# Altium PCB PCB.PcbDoc (part 1 of 2)
Units mm, origin at the board's own origin, x right, y up, seen from the top; angles counter-clockwise.
Board outline 78 x 99 mm, 2 copper layers (Top Layer, Bottom Layer); 105 components, 105 nets, 448 pads, 406 vias.
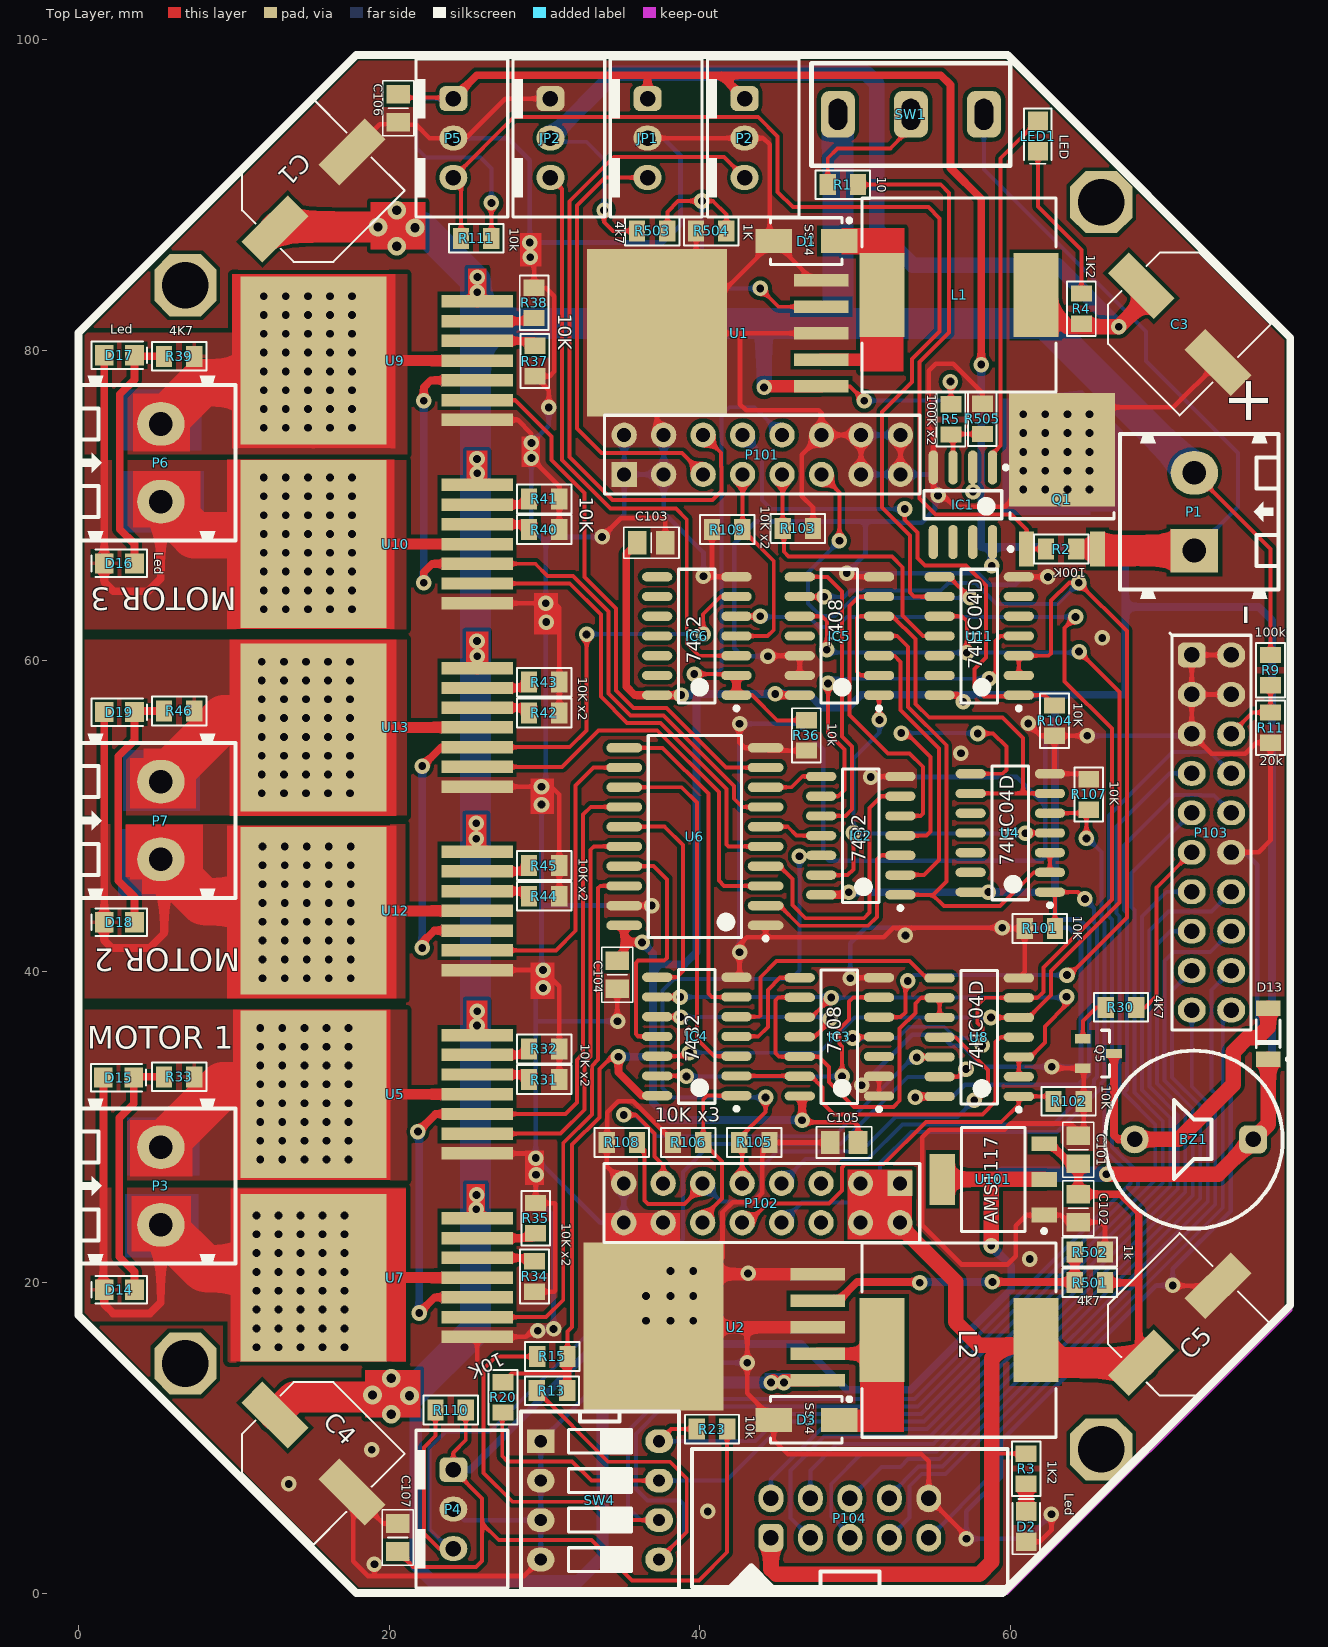
[diagram p0: Top Layer view]
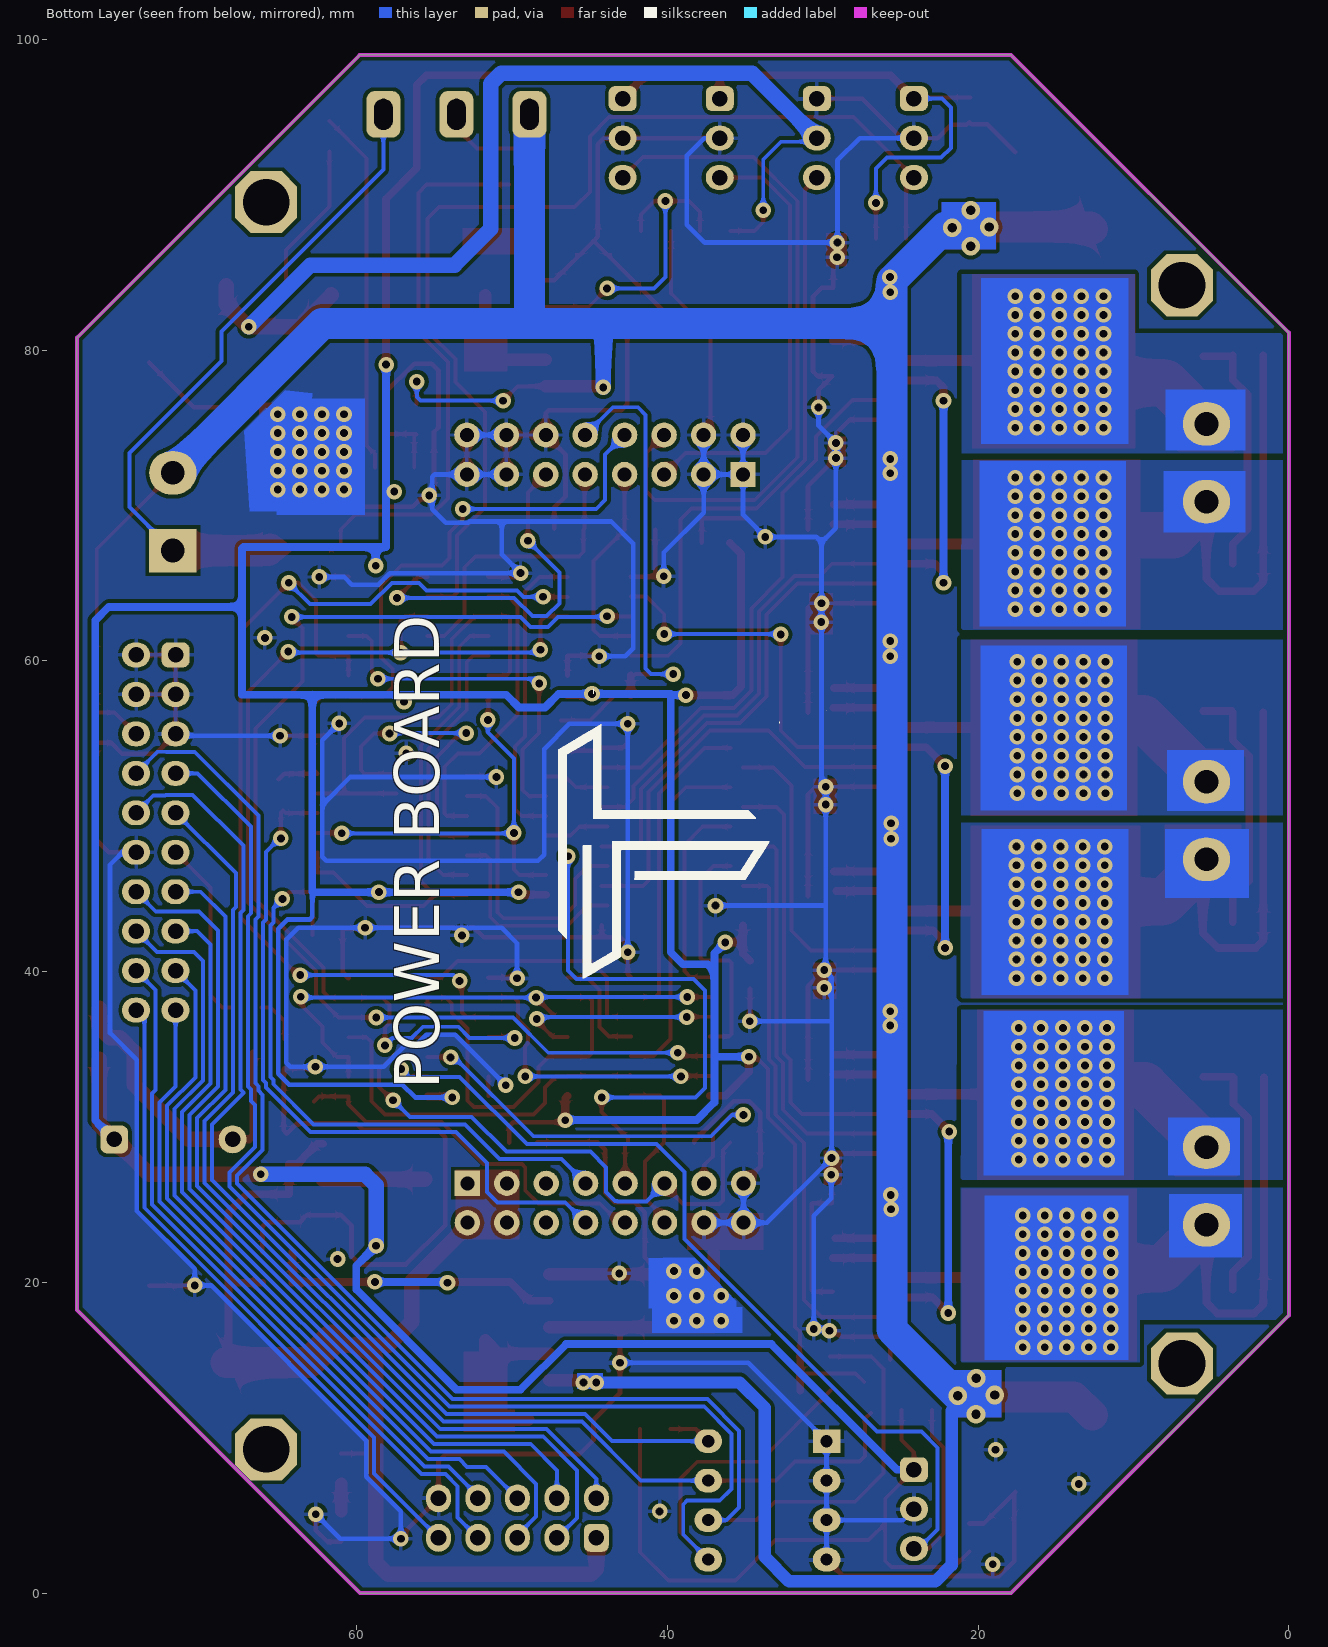
[diagram p1: Bottom Layer view, seen from below]

## Layer stack, top to bottom
Top Solder: solder mask 0.0102, Solder Resist, Dk 3.5
Top Layer: signal copper 0.0356
Dielectric 1: dielectric 0.32, FR-4, Dk 4.8
Bottom Layer: signal copper 0.0356
Bottom Solder: solder mask 0.0102, Solder Resist, Dk 3.5

## Board outline
59.775,0 17.875,0 0,17.875 0,81.125 17.875,99 59.8,99 78,80.8 78,18.225

## Design rules (kind name [scope] priority, off if disabled: settings)
Clearance [All] p1: gap=0.229 ignorepadtopadclearanceinfootprint=FALSE except(0: Arc-Hole Track-Hole SMDPad-Hole THPad-Hole Via-Hole Fill-Hole Poly-Hole Region-Hole Text-Hole; 0.254: Arc-Poly Track-Poly SMDPad-Poly THPad-Poly Via-Poly Fill-Poly Poly-Region Poly-Text; 0.3: Poly-Poly)
PolygonConnect [All] p1: connectstyle=Direct reliefconductorwidth=0.254 reliefentries=4 polygonreliefangle="90 Angle" airgapwidth=0.254
RoutingVias [All] p1: holewidth=0.711 width=1.27 viastyle="Through Hole" minholewidth=0.5 minwidth=1 maxholewidth=0.711 maxwidth=1.27
SolderMaskExpansion [All] p1: expansion=0.102 istentingtop=FALSE
Width [All] p1: maxlimit=10 minlimit=0.254 preferedwidth=0.254
30 further rules are at their usual default settings.

## Classes and differential pairs
component class Sheet1: C1 C3 C4 C5 C101 C102 C103 C104 C105 C106 C107 D1 D2 D3 IC1 L1 L2 LED1 P1 Q1 R1 R2 R3 R4 R5 R501 R502 R503 R504 R505 SW1 U1 U2 U101
component class Sheet2: BZ1 D13 JP1 P2 P103 P104 Q5 R9 R11 R13 R15 R20 R23 R30 SW4
component class Sheet3: D14 D15 D16 D17 D18 D19 IC2 IC3 IC4 IC5 IC6 JP2 P3 P4 P5 P6 P7 P101 P102 R31 R32 R33 R34 R35 R36 R37 R38 R39 R40 R41 R42 R43 R44 R45 R46 R101 R102 R103 R104 R105 R106 R107 R108 R109 R110 R111 U4 U5 U6 U7 U8 U9 U10 U11 U12 U13

## Components (designator, comment, footprint, x,y, rotation, side; value= is the part's Value field where it differs from the comment)
BZ1 "Buzzer" BUZZER 75.6,29.2 r180 top
C1 "470 μF" "WCAP-PSHP 8x7.7x3.1" 15.125,90.275 r45 top
C3 "470 μF" "WCAP-PSHP 8x7.7x3.1" 70.875,81.675 r315 top
C4 "470 μF" "WCAP-PSHP 8x7.7x3.1" 15.125,8.975 r315 top
C5 "470 μF" "WCAP-PSHP 8x7.7x3.1" 70.875,17.3 r45 top
C101 "C" "C 0805" 64.35,28.525 r90 top
C102 "C" "C 0805" 64.35,24.775 r270 top
C103 "C" "C 0805" 36.875,67.6 r0 top
C104 "C" "C 0805" 34.675,39.8 r270 top
C105 "C" "C 0805" 49.275,29 r180 top
C106 "C" "C 0805" 20.575,95.575 r270 top
C107 "C" "C 0805" 20.55,3.575 r90 top
D1 "SS34" "DO-214AC (SMA) L" 46.85,87.025 r0 top
D2 "Led" "Led 0805 Blue" 61,4.275 r270 top
D3 "SS34" "DO-214AC (SMA) L" 46.85,11.15 r0 top
D13 "Diode" "Diode SOD80C Reflow" 76.575,36 r270 top
D14 "Led" "Led 0805 Green" 2.625,19.525 r0 top
D15 "Led" "Led 0805 Blue" 2.575,33.175 r180 top
D16 "Led" "Led 0805 Green" 2.625,66.275 r0 top
D17 "Led" "Led 0805 Blue" 2.625,79.675 r180 top
D18 "Led" "Led 0805 Green" 2.625,43.175 r0 top
D19 "Led" "Led 0805 Blue" 2.625,56.7 r180 top
IC1 "LM358" SOIC-8 56.925,70.05 r270 top
IC2 "7432" SOIC-14 50.35,48.75 r180 top
IC3 "7408" SOIC-14 48.975,35.8 r180 top
IC4 "7432" SOIC-14 39.8,35.825 r180 top
IC5 "7408" SOIC-14 48.975,61.6 r180 top
IC6 "7432" SOIC-14 39.8,61.6 r180 top
JP1 "JP3" HDR/Header/3/BOX 36.625,93.65 r0 top
JP2 "JP3" HDR/Header/3/BOX 30.375,93.65 r0 top
L1 "330uF" 1210 56.675,83.55 r90 top
L2 "330uF" 1210 56.675,16.275 r90 top
LED1 "LED" "Led 0805 Blue" 61.75,93.775 r90 top
P1 "Header 2" HDR/Terminal/2/5mm#1 71.825,69.6 r90 top
P2 "Header 3" HDR/Header/3/BOX 42.875,93.65 r0 top
P3 "Header 2" HDR/Terminal/2/5mm#2 5.3,26.2 r270 top
P4 "Header 3" HDR/Header/3/BOX 24.125,5.4 r0 top
P5 "Header 3" HDR/Header/3/BOX 24.125,93.65 r0 top
P6 "Header 2" HDR/Terminal/2/5mm#2 5.3,72.75 r270 top
P7 "Header 2" HDR/Terminal/2/5mm#2 5.3,49.725 r270 top
P101 "Header 8X2" CON2X8N 35.125,72 r0 top
P102 "Header 8X2" CON2X8N 52.875,26.375 r180 top
P103 "Header 10X2" HDR/Header/20/DL 72.925,48.95 r270 top
P104 "Header 5X2" HDR/Header/10/DL/BOX 49.65,4.825 r180 top
Q1 "Mosfet N" "TO-252 (DPAK)" 63.3,71.65 r90 top
Q5 "Transistor NPN" SOT-23 65.65,34.725 r0 top
R1 "10" "R 0805" 49.2,90.65 r180 top
R2 "100K" "R 0805" 63.25,67.2 r180 top
R3 "1K2" "R 0805" 61,8 r90 top
R4 "1K2" "R 0805" 64.55,82.675 r270 top
R5 "100K x2" "R 0805" 56.15,75.55 r90 top
R9 "100k" "R 0805" 76.725,59.4 r90 top
R11 "20k" "R 0805" 76.725,55.7 r90 top
R13 "10K" "R 0805" 30.475,13.025 r180 top
R15 "10k" "R 0805" 30.5,15.225 r180 top
R20 "10k" "R 0805" 27.325,12.6 r270 top
R23 "10k" "R 0805" 40.775,10.55 r180 top
R30 "4K7" "R 0805" 67.1,37.7 r180 top
R31 "10K x2" "R 0805" 29.975,33.05 r0 top
R32 "10k" "R 0805" 29.975,35.025 r0 top
R33 "4k7" "R 0805" 6.475,33.225 r0 top
R34 "10K x2" "R 0805" 29.35,20.375 r270 top
R35 "10k" "R 0805" 29.425,24.125 r90 top
R36 "10k" "R 0805" 46.85,55.2 r270 top
R37 "10K" "R 0805" 29.375,79.3 r270 top
R38 "10k" "R 0805" 29.325,83.05 r90 top
R39 "4K7" "R 0805" 6.475,79.6 r0 top
R40 "10k" "R 0805" 29.975,68.45 r0 top
R41 "10K" "R 0805" 29.975,70.425 r0 top
R42 "10k" "R 0805" 29.975,56.65 r180 top
R43 "10K x2" "R 0805" 29.975,58.625 r180 top
R44 "10K x2" "R 0805" 29.975,44.85 r180 top
R45 "10k" "R 0805" 29.975,46.825 r180 top
R46 "4k7" "R 0805" 6.475,56.775 r0 top
R101 "10K" "R 0805" 61.875,42.775 r0 top
R102 "10K" "R 0805" 63.725,31.65 r180 top
R103 "10K x2" "R 0805" 46.3,68.525 r180 top
R104 "10K" "R 0805" 62.825,56.15 r90 top
R105 "10K x3" "R 0805" 43.5,29 r180 top
R106 "10k" "R 0805" 39.237,29 r0 top
R107 "10K" "R 0805" 65.025,51.4 r270 top
R108 "10k" "R 0805" 34.975,29 r0 top
R109 "10k" "R 0805" 41.75,68.45 r0 top
R110 "10k" "R 0805" 23.95,11.775 r180 top
R111 "10k" "R 0805" 25.6,87.2 r180 top
R501 "4k7" "R 0805" 65.1,19.975 r0 top
R502 "1k" "R 0805" 65.1,21.95 r180 top
R503 "4k7" "R 0805" 36.925,87.675 r180 top
R504 "1K" "R 0805" 40.725,87.675 r0 top
R505 "100k" "R 0805" 58.175,75.575 r270 top
SW1 "SW SPDT" SW/3/SPDT/SS12D10 53.575,95.175 r180 top
SW4 "SW DIP-4" SW/DIP4 29.75,9.775 r270 top
U1 "LM2596S" "TO263 5" 43.75,81.1 r90 top
U2 "LM2596S" "TO263 5" 43.525,17.125 r90 top
U4 "74HC04D" SOIC-14 59.975,48.925 r180 top
U5 "BTS7960" BTS7960 21.975,32.105 r90 top
U6 "74LVC244A" SOIC20-W 44.225,42.975 r90 top
U7 "BTS7960" BTS7960 21.975,20.3 r90 top
U8 "74HC04D" SOIC-14 57.975,35.775 r180 top
U9 "BTS7960" BTS7960 21.975,79.325 r90 top
U10 "BTS7960" BTS7960 21.975,67.52 r90 top
U11 "74HC04D" SOIC-14 57.975,61.6 r180 top
U12 "BTS7960" BTS7960 21.975,43.91 r90 top
U13 "BTS7960" BTS7960 21.975,55.715 r90 top
U101 "AMS1117" SOT-223 58.875,26.625 r180 top

## Footprints (in the part's own frame and the unit in brackets; to place one, negate y for a bottom-side part, rotate by r counter-clockwise, add the part's x,y. Pads: shape width x height; smd on the part's side, far side on the other; paste and mask are expansions set on the pad)
1210 [mm] "Precision Wire Wound Inductor, 2-Leads, Body 12.0x12.0mm, IPC Medium Density"
  rect 5.4x2.9 smd: 1(0,4.95) 2(0,-4.95)
  silkscreen extent -6.25,-6.25 6.25,6.25, body extent -6,-6 6,6, height 9.7
BTS7960 [mm]
  rect 0.8x4.6 smd: 1(-3.81,-3.683) 2(-2.54,-3.683) 3(-1.27,-3.683) 4(0,-3.683) 5(1.27,-3.683) 6(2.54,-3.683) 7(3.81,-3.683)
  rect 10.8x9.4 smd: 8(0,6.858)
  body extent -5,-4.99 5,10.68, height 4.88
BUZZER [mm] "DC Buzzer 5V/12V"
  rrect50% 1.8x1.8 hole 1: 1(0,0)
  round 1.8 hole 1: 2(7.62,0)
  silkscreen extent -1.91,-5.71 9.53,5.75, body extent -5.64,-6 9.81,6, height 9.65
"C 0805" [mm] "Chip Capacitor, 2-Leads, Body 2.0x1.3mm, IPC Medium Density"
  rect 1.2x1.5 smd: 1(-0.9,0) 2(0.9,0)
  silkscreen extent -1.78,-1 1.78,1, body extent -1,-0.64 1,0.61, height 0.6
CON2X8N [mil]
  rect 64x64 hole 35.43: 1(0,0)
  round 64 hole 35.43: 2(0,100) 3(100,0) 4(100,100) 5(200,0) 6(200,100) 7(300,0) 8(300,100) 9(400,0) 10(400,100) 11(500,0) 12(500,100) 13(600,0) 14(600,100) 15(700,0) 16(700,100)
  silkscreen extent -50,-50 750,150, body extent -50,-50 750,150, height 350
"Diode SOD80C Reflow" [mm]
  rect 1x1.6 smd: 1(-1.65,0) 2(1.65,0)
  silkscreen extent -0.89,-0.76 1.75,1.37, body extent -1.75,-0.73 1.75,0.73, height 1.44
"DO-214AC (SMA) L" [mm] "Molded Diode, 2-Leads, Body 4.3x2.7mm, IPC Medium Density"
  rect 2.35x1.55 smd: 1(-2.1,0) 2(2.1,0)
  silkscreen extent -2.3,-1.5 2.89,1.5, body extent -2.6,-1.3 2.6,1.3, height 2.4
HDR/Header/3/BOX [mm]
  rrect50% 1.8x1.6 hole 1: 1(0,2.54)
  oval 1.8x1.6 hole 1: 2(0,0) 3(0,-2.54)
  silkscreen extent -2.41,-5.08 3.5,5.08, body extent -2.29,-5 3.41,5, height 7
HDR/Header/10/DL/BOX [mm] "10 pins Male Box Header, IDC Socket"
  rrect50% 1.6x1.8 hole 1: 1(5.08,1.27)
  oval 1.6x1.8 hole 1: 2(5.08,-1.27) 3(2.54,1.27) 4(2.54,-1.27) 5(0,1.27) 6(0,-1.27) 7(-2.54,1.27) 8(-2.54,-1.27) 9(-5.08,1.27) 10(-5.08,-1.27)
  silkscreen extent -10.16,-4.45 10.16,4.58, body extent -10.16,-4.81 10.16,4.66, height 9.27
HDR/Header/20/DL [mm]
  rrect50% 1.6x1.8 hole 1: 1(-11.43,-1.27)
  oval 1.6x1.8 hole 1: 2(-11.43,1.27) 3(-8.89,-1.27) 4(-8.89,1.27) 5(-6.35,-1.27) 6(-6.35,1.27) 7(-3.81,-1.27) 8(-3.81,1.27) 9(-1.27,-1.27) 10(-1.27,1.27) 11(1.27,-1.27) 12(1.27,1.27) 13(3.81,-1.27) 14(3.81,1.27) 15(6.35,-1.27) 16(6.35,1.27) 17(8.89,-1.27) 18(8.89,1.27) 19(11.43,-1.27) 20(11.43,1.27)
  silkscreen extent -12.83,-2.67 12.7,2.54, body extent -12.7,-2.54 12.7,2.54, height 8.89
HDR/Terminal/2/5mm#1 [mil] "Header 2, 2 pin, hight 400mil, Pin to Pin 200mil, Colour Green"
  rect 110x120 hole 60: 1(-98.43,0)
  oval 110x120 hole 60: 2(98.43,0)
  silkscreen extent -220,-213 197,189, body extent -220,-215 197,191, height 559
HDR/Terminal/2/5mm#2 [mil] "Header 2, 2 pin, hight 400mil, Pin to Pin 200mil, Colour Green"
  oval 110x120 hole 60: 1(-98.43,0) 2(98.43,0)
  silkscreen extent -220,-213 197,189, body extent -220,-215 197,191, height 559
"Led 0805 Blue" [mm] "Led SMD 0805"
  rect 1.2x1.3 smd: 1(-0.975,0) 2(0.975,0)
  silkscreen extent -1.78,-0.89 1.78,0.89, body extent -1.01,-0.62 1.01,0.63, height 1.1
"Led 0805 Green" [mm] "Led SMD 0805"
  rect 1.2x1.3 smd: 1(-0.975,0) 2(0.975,0)
  silkscreen extent -1.78,-0.89 1.78,0.89, body extent -1.01,-0.62 1.01,0.63, height 1.1
"R 0805" [mm] "Chip Resistor, 2-Leads, Body 2.0x1.3mm, IPC Medium Density"
  rect 1.05x1.35 smd: 1(-0.975,0) 2(0.975,0)
  silkscreen extent -1.75,-0.92 1.75,0.92, body extent -1,-0.61 1,0.59, height 0.5
SOIC20-W [mm] "SOIC, 20-Leads, Body 12.8x7.5mm, Pitch 1.27mm, IPC Medium Density"
  oval 0.6x2.3 smd: 1(0,0) 2(1.27,0) 3(2.54,0) 4(3.81,0) 5(5.08,0) 6(6.35,0) 7(7.62,0) 8(8.89,0) 9(10.16,0) 10(11.43,0) 11(11.43,9.1) 12(10.16,9.1) 13(8.89,9.1) 14(7.62,9.1) 15(6.35,9.1) 16(5.08,9.1) 17(3.81,9.1) 18(2.54,9.1) 19(1.27,9.1) 20(0,9.1)
  silkscreen extent -0.97,-0.13 12.21,7.55, body extent -0.68,0.8 12.11,8.3, height 2.65
SOIC-8 [mm] "SOIC, 8-Leads, Body 5.0x4.0mm (max), Pitch 1.27mm, IPC Medium Density"
  oval 2.2x0.6 smd: 1(-2.4,1.905) 2(-2.4,0.635) 3(-2.4,-0.635) 4(-2.4,-1.905) 5(2.4,-1.905) 6(2.4,-0.635) 7(2.4,0.635) 8(2.4,1.905)
  silkscreen extent -2.52,-2.5 0.9,2.88, body extent -3,-2.49 3,2.41, height 1.75
SOIC-14 [mm] "SOIC, 14-Leads, Body 8.6x3.9mm (max), Pitch 1.27mm, IPC Medium Density"
  oval 1.95x0.6 smd: 1(-2.55,3.81) 2(-2.55,2.54) 3(-2.55,1.27) 4(-2.55,0) 5(-2.55,-1.27) 6(-2.55,-2.54) 7(-2.55,-3.81) 8(2.55,-3.81) 9(2.55,-2.54) 10(2.55,-1.27) 11(2.55,0) 12(2.55,1.27) 13(2.55,2.54) 14(2.55,3.81)
  silkscreen extent -2.68,-4.3 1.17,4.78, body extent -3.03,-4.34 3.03,4.36, height 1.95
SOT-23 [mm] "SOT23, 3-Leads, Body 3.0x2.5mm (max), Pitch 0.95mm, IPC Medium Density"
  rect 1x0.6 smd: 1(-1,0.95) 2(-1,-0.95) 3(1,0)
  silkscreen extent 0.2,-1.5 0.7,1.5, body extent -1.28,-1.46 1.27,1.46, height 0.95
SOT-223 [mm] "SOT223, 4-Leads, Body 6.7x7.3mm (max), Pitch 2.30mm, IPC Medium Density"
  rect 1.65x0.95 smd: 1(-3.275,2.3) 2(-3.275,0) 3(-3.275,-2.3)
  rect 1.65x3.3 smd: 4(3.275,0)
  silkscreen extent -3.4,-3.35 2.05,3.45, body extent -3.5,-3.25 3.5,3.25, height 1.64
SW/3/SPDT/SS12D10 [mm]
  rrect50% 2.2x3 hole 1.2 slot 2 at 90 deg: 1(-4.7,0) 2(0,0) 3(4.7,0)
  silkscreen extent -6.4,-3.3 6.4,3.3, body extent -6.4,-3.3 6.35,3.8, height 12.5
SW/DIP4 [mil]
  rect 60x70 hole 31: 1(0,0)
  oval 60x70 hole 31: 2(100,0) 3(200,0) 4(300,0) 5(300,300) 6(200,300) 7(100,300) 8(0,300)
  silkscreen extent -75,-50 375,350, body extent -50,0 350,300, height 165
"TO263 5" [mm] "LM2596S"
  rect 0.8x3.5 smd: 1(-3.429,-4.064) 2(-1.722,-4.064) 3(-0.015,-4.064) 4(1.693,-4.064) 5(3.4,-4.064)
  rect 10.8x9 smd: 6(0.025,6.525)
  body extent -5,-4.99 5,10.68, height 4.88
"TO-252 (DPAK)" [mm] "D-PAK, 3-Pads, Body 6.2x6.7mm (max), IPC Medium Density"
  rect 2.25x0.95 smd: 1(-4.45,2.28) 3(-4.45,-2.28)
  rect 7.3x6.8 smd: 2(1.95,0)
  silkscreen extent -4.57,-3.35 -2.1,3.43, body extent -4.54,-3.27 5.4,3.27, height 2.41
"WCAP-PSHP 8x7.7x3.1" [mm] "Polarized capacitors, Aluminum Polymer Capacitors, 2-Leads, Body 8x7.7x3.1"
  rect 4.2x1.9 smd: 1(-3.5,0) 2(3.5,0)
  silkscreen extent -4.15,-4.15 4.15,4.15, body extent -4.54,-4.17 4.46,4.13, height 7.65

## Part data
C1 C3 C4 C5: library part "WCAP-PSHP 8x7.7x3.1 875115150001", "WCAP-PSHP Aluminum Polymer Capacitors , 220 µF; + / - 20%; 6,3 V , 8 x 7,7"
C101 C102 C103 C104 C105 C106 C107: library part "Capacitor NP", "Capacitor non-pol"
D1 D3: library part Zener
D2 D14 D15 D16 D17 D18 D19: "Typical LED"
D13: "Default Diode"
IC1: "Low Power Dual Operational Amplifier, 8-pin MDIP"
IC2 IC4 IC6: "Quad 2-Input OR Gate"
IC3 IC5: "Quad 2-Input AND Gate"
JP1 JP2: library part Con3, "Connector 3"
L1 L2: library part Component_1
LED1: library part LEDSMD, "LED 3mm"
P1 P3 P6 P7: "Header, 2-Pin"
P2 P4 P5: "Header, 3-Pin"
P101 P102: "Header, 8-Pin, Dual row"
P103: "Header, 10-Pin, Dual row"
P104: "Header, 5-Pin, Dual row"
Q5: "NPN Bipolar Transistor"
R1 R2 R3 R4 R5 R9 R11 R13 R15 R20 R23 R30 R31 R32 R33 R34 R35 R36 R37 R38 R39 R40 R41 R42 R43 R44 R45 R46 R101 R102 R103 R104 R105 R106 R107 R108 R109 R110 R111 R501 R502 R503 R504 R505: library part Resistor, "Resistor"
U4 U8 U11: "IC INVERTER HEX TTL/LSTTL 14SOIC"
U6: "Octal Buffer/Driver with 3-State Outputs"
U101: "1A LDO Voltage Regulator, ADJ or fixed 1.5/1.8/2.5/2.85/3.3/5V"

## Free pads (board coordinates)
  oct 4x4 hole 3: 2(65.825,9.25) 3(65.825,89.525) 4(6.875,14.775) 5(6.875,84.175)

## Via types
v1: diameter 1, hole 0.5, Top Layer to Bottom Layer, tented both sides, 398 vias
v2: diameter 1.2, hole 0.6, Top Layer to Bottom Layer, tented both sides, 8 vias

## Nets (pads, with @x,y where several pads share a name; then routed paths per layer and width w, separated by ;. In a path a pad name is that pad's centre, name@x,y a point inside that pad or via, vN(x,y) a via of type N, cw(c..) or ccw(c..) an arc to the next point about the centre after c; other vN are vias at no path point)
6V: C3.1 JP2.2 L1.2 R4.2 R503.2 | length 70.4
  Top Layer w0.254: v1(33.825,89) 33.825,88.25 34.4,87.675 R503.2@35.95,87.675
  Top Layer w1: L1.2@61.625,83.55 63.675,81.5 v1(66.95,81.5) 68.4,82.95 C3.1@68.4,84.15
  Bottom Layer w0.254: JP2.2@30.375,93.65 30.612,93.413 32.687,93.413 33.825,92.275 v1(33.825,89)
  Bottom Layer w1: JP2.2@30.375,93.65 34.55,97.825 50.7,97.825 51.375,97.15 51.375,87.8 53.7,85.475 62.975,85.475 v1(66.95,81.5)
7V: C5.1 C101.1 C102.1 L2.2 P102.1 P102.2 P102.3 P102.4 P102.5 P102.6 P104.1 R3.2 R501.2 U101.3 | length 80.6
  Top Layer w0.254: 58.775,8.775 58.975,8.975 R3.2@61,8.975 ; L2.2@61.312,15.963 L2.2@61.625,16.275
  Top Layer w0.5: P102.4@50.335,23.835 P102.3@50.335,26.375 P102.1@52.875,26.375 ; U101.3@62.15,28.925 62.525,28.925 63.825,27.625 C101.1@64.35,27.625 C102.1@64.35,25.675 67.075,25.675 68.25,24.5 68.25,20.2 ; R501.2@66.075,19.975 68.025,19.975 68.25,20.2 ; C5.1@68.4,14.825 68.25,14.975 68.25,20.2
  Top Layer w1: P104.1@44.57,3.555 44.57,1.545 44.915,1.2 57.975,1.2 58.775,2 58.775,8.775 58.775,15.1 59.637,15.963 ; P102.2@52.875,23.835 52.875,23.625 56.45,20.05 56.45,17.45 57.937,15.963 59.637,15.963 ; L2.2@61.312,15.963 59.637,15.963
  Top Layer w2: L2.2@61.625,16.275 63.075,14.825 C5.1@68.4,14.825
ADC1: P103.13 P104.2 | length 56.7
  Bottom Layer w0.254: P104.2@44.57,6.095 44.57,7.327 47.788,10.546 54.618,10.546 70.272,26.199 70.272,30.571 68.451,32.391 68.451,43.551 70.04,45.14 P103.13@71.655,45.14
ADC2: P103.14 P104.3 | length 61
  Bottom Layer w0.254: P104.3@47.11,3.555 45.825,4.84 45.825,7.9 47.988,10.063 54.818,10.063 70.754,25.999 70.754,30.771 68.934,32.591 68.934,42.659 70.15,43.875 72.93,43.875 P103.14@74.195,45.14
ADC3: P103.15 P104.4 | length 52.6
  Bottom Layer w0.254: P104.4@47.11,6.095 47.11,7.898 48.792,9.58 55.018,9.58 71.237,25.799 71.237,30.97 69.416,32.791 69.416,41.741 70.275,42.6 P103.15@71.655,42.6
ADC4: P103.16 P104.5 | length 55.9
  Bottom Layer w0.254: P104.5@49.65,3.555 49.65,3.725 48.45,4.925 48.45,7.025 50.523,9.098 55.218,9.098 71.72,25.6 71.72,31.17 69.899,32.991 69.899,40.674 70.475,41.25 72.845,41.25 P103.16@74.195,42.6
ADC5: P103.17 P104.6 | length 46.5
  Bottom Layer w0.254: P104.6@49.65,6.095 51.68,8.125 52.895,8.125 53.385,8.615 55.418,8.615 72.202,25.4 72.202,31.37 70.382,33.191 70.382,38.787 P103.17@71.655,40.06
ADC6: P103.18 P104.7 | length 46.7
  Bottom Layer w0.254: P104.7@52.19,3.555 53.5,4.865 53.5,6.875 54.275,7.65 55.818,7.65 73.167,25 73.167,32.158 72.939,32.386 72.939,38.804 P103.18@74.195,40.06
ADC7: P103.19 P104.8 | length 41.2
  Bottom Layer w0.254: P104.8@52.19,6.095 52.19,6.247 54.075,8.133 55.618,8.133 72.685,25.2 72.685,31.57 71.655,32.6 P103.19@71.655,37.52
ADC8: P103.20 P104.9 | length 42
  Bottom Layer w0.254: P104.9@54.73,3.555 58.875,7.7 58.875,10.025 73.65,24.8 73.65,36.975 P103.20@74.195,37.52
B-: P1.1 Q1.3 R2.1 SW1.1 | length 43.6
  Top Layer w0.254: R2.1@64.225,67.2 Q1.3@65.58,67.2
  Top Layer w2: Q1.3@65.58,67.2 65.68,67.1 P1.1@71.825,67.1
  Bottom Layer w0.254: SW1.1@58.275,95.175 58.275,91.625 68.7,81.2 68.7,79.3 74.625,73.375 74.625,69.9 P1.1@71.825,67.1
BRK1: IC2.12 P102.9 R105.2 | length 36.3
  Top Layer w0.254: P102.9@42.715,26.375 42.715,28.81 R105.2@42.525,29 42.525,29.275 44.225,30.975 v1(44.225,31.9) ; v1(46.4,47.425) v1@46.5,47.525
  Bottom Layer w0.254: v1(44.225,31.9) 38.175,31.9 37.575,32.5 37.575,38.775 38.325,39.525 45.85,39.525 46.4,40.075 v1(46.4,47.425)
BRK2: IC4.1 P102.12 R106.2 | length 11.2
  Top Layer w0.254: P102.12@40.175,23.835 40.175,24.15 41.425,25.4 41.425,27.788 R106.2@40.213,29 40.213,31.762 40.465,32.015 IC4.1@42.35,32.015
BRK3: IC6.4 P101.7 R109.2 | length 13.4
  Top Layer w0.254: IC6.4@42.35,61.6 44.35,61.6 44.75,62 44.75,66.425 R109.2@42.725,68.45 42.745,68.47 P101.7@42.745,72
D1: IC2.4 U4.8 | length 20.5
  Top Layer w0.254: IC2.4@52.9,48.75 54.575,48.75 54.833,49.008 54.833,53.385 54.825,53.393 54.825,53.825 53.3,55.35 v1(52.95,55.35) ; U4.8@57.425,52.735 59.485,52.735 59.725,52.975 59.725,54.475 58.875,55.325 v1(57.875,55.325)
  Bottom Layer w0.254: v1(52.95,55.35) 57.9,55.35 v1(57.875,55.325)
D1~: IC5.2 IC5.5 U4.6 U4.9 | length 30
  Top Layer w0.254: IC5.2@51.525,59.06 50.355,59.06 50.115,59.3 50.115,62.75 50.235,62.87 IC5.5@51.525,62.87 52.405,62.87 53.875,61.4 53.875,57.232 54.757,56.35 59.475,56.35 60.8,55.025 60.8,51.465 ; U4.9@57.425,51.465 60.8,51.465 ; U4.6@62.525,51.465 60.8,51.465
D2: IC4.5 U8.8 | length 16.5
  Top Layer w0.254: IC4.5@42.35,37.095 43.805,37.095 43.885,37.175 43.885,39.635 44.925,40.675 53.5,40.675 54.59,39.585 U8.8@55.425,39.585
D2~: IC3.9 IC3.12 U8.9 U8.10 | length 24.9
  Top Layer w0.254: IC3.9@46.425,38.34 45.04,38.34 44.85,38.15 44.85,34.75 45.07,34.53 IC3.12@46.425,34.53 47.62,34.53 48.294,33.856 48.294,32.896 49.907,31.283 52.45,31.283 52.856,31.688 52.856,36.323 53.875,37.343 53.875,37.95 54.24,38.315 U8.9@55.425,38.315 U8.10@55.425,37.045
D3: IC2.9 U11.4 | length 23.7
  Top Layer w0.254: IC2.9@47.8,51.29 48.907,51.29 49.317,51.7 49.317,54.285 48.25,55.353 v1(48.25,58.55) ; v1(58.625,58.85) 58.625,58.925 59.025,59.325 59.025,61.275 59.35,61.6 U11.4@60.525,61.6
  Bottom Layer w0.254: v1(48.25,58.55) 48.55,58.85 v1(58.625,58.85)
D3~: IC3.5 IC5.9 U11.2 U11.3 | length 71.1
  Top Layer w0.254: IC5.9@46.44,64.125 v1(48,64.125) ; IC3.5@51.525,37.07 52.92,37.07 53.225,37.375 53.225,39.4 v1(53.375,39.4) ; U11.2@60.525,59.06 U11.3@60.525,60.33 62.445,60.33 62.6,60.485 62.6,63.875 63.75,65.025 v1(64.375,65.025) 67.475,61.925 67.475,43.475 63.775,39.775 v1(63.625,39.775)
  Bottom Layer w0.254: v1(48,64.125) 49.26,64.125 49.668,64.533 55.5,64.533 55.992,65.025 57.725,65.025 59.1,63.65 63,63.65 v1(64.375,65.025) ; v1(53.375,39.4) 53.75,39.775 v1(63.625,39.775)
DIR1: P102.8 R107.2 U4.5 | length 46.1
  Top Layer w0.254: U4.5@62.525,50.195 64.57,50.195 64.75,50.375 64.875,50.25 v1(64.875,48.575)
  Bottom Layer w0.254: P102.8@45.255,23.835 46.57,25.15 50.925,25.15 51.6,25.825 51.6,27.675 53.6,29.675 62.967,29.675 65.842,32.55 65.842,32.82 66.038,33.016 66.038,43.164 65.842,43.359 65.842,47.708 65.1,48.45 65,48.45 v1(64.875,48.575)
DIR2: P102.11 R108.2 U8.11 | length 36.3
  Top Layer w0.254: R108.2@35.95,29 36.425,28.525 36.425,25.275 36.65,25.05 39,25.05 40.175,26.225 P102.11@40.175,26.375 ; U8.11@55.425,35.775 56.44,35.775 58.548,33.667 58.548,32.575 57.698,31.725 v1(57.65,31.725)
  Bottom Layer w0.254: P102.11@40.175,26.375 41.343,25.207 43.217,25.207 43.236,25.225 43.375,25.225 43.95,25.8 43.95,27.4 44.958,28.408 50.358,28.408 52.6,30.65 56.575,30.65 v1(57.65,31.725)
DIR3: P101.8 R104.2 U11.1 | length 35.3
  Top Layer w0.254: v1(53.175,69.775) 53.175,69.107 54.015,68.267 54.015,66.625 54.49,66.15 57.125,66.15 58.425,64.85 58.425,60.225 57.675,59.475 57.675,58.325 58.281,57.719 60.454,57.719 U11.1@60.525,57.79 62.16,57.79 R104.2@62.825,57.125
  Bottom Layer w0.254: P101.8@42.745,74.54 44,73.285 44,70.35 44.575,69.775 v1(53.175,69.775)
EN1: U5.3 U6.14 U7.3 | length 48.4
  Top Layer w0.254: U5.3@25.658,30.835 31.335,30.835 32.075,31.575 32.075,34.322 32.485,34.732 32.485,50.11 32.97,50.595 U6.14@35.125,50.595
  Top Layer w0.5: v1(21.85,29.7) 22.985,30.835 U5.3@25.658,30.835 ; v1(21.925,18.025) 22.93,19.03 U7.3@25.658,19.03
  Bottom Layer w0.5: v1(21.85,29.7) 21.925,29.7 v1(21.925,18.025)
EN1_: IC2.11 U6.6 | length 4.2
  Top Layer w0.254: U6.6@43.85,49.325 45.65,49.325 46.225,48.75 IC2.11@47.8,48.75
EN2: U6.7 U9.3 U10.3 | length 49.2
  Top Layer w0.254: U10.3@25.658,66.25 29.4,66.25 30.187,65.463 31.82,65.463 34.108,63.175 34.108,57.9 35.517,56.49 37.65,56.49 42.19,51.95 42.19,51.125 42.72,50.595 U6.7@44.225,50.595
  Top Layer w0.5: v1(22.225,65.025) 22.225,65.7 22.775,66.25 U10.3@25.658,66.25 ; v1(22.225,76.75) 22.225,77.6 22.68,78.055 U9.3@25.658,78.055
  Bottom Layer w0.5: v1(22.225,65.025) v1(22.225,76.75)
EN2_: IC4.3 U6.13 | length 22.5
  Top Layer w0.254: U6.13@35.925,51.865 38.81,51.865 39.8,50.875 39.8,35.65 40.895,34.555 IC4.3@42.35,34.555
EN3: IC6.6 U12.3 U13.3 | length 45
  Top Layer w0.254: U13.3@25.658,54.445 31.62,54.445 32.7,55.525 v1(32.7,61.7) ; v1(40.2,61.725) 40.2,63 41.34,64.14 IC6.6@42.35,64.14
  Top Layer w0.5: v1(22.125,41.525) 22.125,41.875 22.89,42.64 U12.3@25.658,42.64 ; v1(22.125,53.225) 23.345,54.445 U13.3@25.658,54.445
  Bottom Layer w0.254: v1(32.7,61.7) 32.725,61.725 v1(40.2,61.725)
  Bottom Layer w0.5: v1(22.125,41.525) v1(22.125,53.225)
"ENCODER 1": P102.13 U8.12 | length 28.9
  Top Layer w0.254: v1(35.1,30.775) 35.878,30.775 37.075,29.578 37.075,28.11 37.635,27.55 P102.13@37.635,26.375 ; v1(53.95,34.475) 53.98,34.505 U8.12@55.425,34.505
  Bottom Layer w0.254: v1(35.1,30.775) 35.825,30.775 37.2,29.4 48.627,29.4 53.702,34.475 v1(53.95,34.475)
"ENCODER 2": P101.11 U11.8 | length 23.4
  Top Layer w0.254: P101.11@47.825,72 48.975,70.85 v1(48.975,67.725) ; U11.8@55.425,65.41 56.04,65.41 v1(57.4,64.05)
  Bottom Layer w0.254: v1(48.975,67.725) 46.95,65.7 46.95,63.7 47.775,62.875 48.692,62.875 49.867,64.05 v1(57.4,64.05)
GATE: JP1.3 P101.5 | length 29
  Top Layer w0.254: JP1.3@36.625,91.11 33.885,91.11 32.09,89.315 32.09,74.95 33.669,73.372 38.833,73.372 P101.5@40.205,72
GND: C1.2 C3.2 C4.2 C5.2 C101.2 C102.2 C103.2 C104.2 C105.2 C106.2 C107.2 D1.1 D2.2 D3.1 IC1.4 IC2.7 IC3.1 IC3.2 IC3.7 IC4.7 IC5.7 IC5.12 IC5.13 IC6.7 JP1.2 JP2.1 P2.2 P4.2 P5.2 P101.1 P101.2 P101.3 P101.4 P101.12 P101.13 P101.14 P101.15 P101.16 P102.14 P102.15 P102.16 P103.1 P103.2 P103.3 P103.4 P103.5 P103.12 P104.10 Q1.2 Q5.2 R11.1 R31.2 R32.2 R34.2 R35.2 R36.2 R37.2 R38.2 R40.2 R41.2 R42.1 R43.1 R44.1 R45.1 R101.1 R102.1 R103.1 R104.1 R105.1 R106.1 R107.1 R108.1 R109.1 R502.1 R504.1 R505.1 SW4.1 SW4.2 SW4.3 SW4.4 U1.3 U1.5 U1.6 U2.3 U2.5 U2.6 U4.7 U5.1 U6.1 U6.10 U6.19 U7.1 U8.7 U9.1 U10.1 U11.7 U12.1 U13.1 U101.1 | length 837.3
  Top Layer w0.254: P101.4@37.225,74.98 U1.6@37.225,81.125 39.75,83.65 R504.1@39.75,87.675 ; IC3.1@51.525,31.99 IC3.2@51.525,33.26
  Top Layer w0.3: C4.2@17.6,6.5 C4.2@17.675,6.425 ; C1.2@17.6,92.75 19.398,94.548 20.448,94.548 C106.2@20.575,94.675 20.75,94.5 21.741,94.5 22.591,93.65 P5.2@24.125,93.65 24.925,93.65 27.465,96.19 JP2.1@30.375,96.19 ; v1(19.05,1.85) 19.05,1.175 18.975,1.1 ; C107.2@20.55,4.475 19.625,4.475 C4.2@17.675,6.425 ; P4.2@23.6,5.4 P4.2@24.125,5.4 ; 25.658,15.033 U7.1@25.658,16.49 28.79,16.49 v1@29.3,17 ; U5.1@25.658,28.295 29.13,28.295 v1(29.425,28) R35.2@29.425,25.1 30.644,25.1 30.694,25.05 30.694,19.475 30.619,19.4 R34.2@29.35,19.4 ; U12.1@25.658,40.1 v1(29.9,40.1) 30.95,39.05 R32.2@30.95,35.025 R31.2@30.95,33.05 ; U13.1@25.658,51.905 v1(29.8,51.905) 30.445,51.905 30.95,51.4 R45.1@30.95,46.825 R44.1@30.95,44.85 ; U10.1@25.658,63.71 v1(30.075,63.71) 30.665,63.71 30.95,63.425 R43.1@30.95,58.625 R42.1@30.95,56.65 ; U9.1@25.658,75.515 28.26,75.515 29.15,74.625 v1(29.15,74.025) v1(29.15,73.05) 30.95,71.25 R41.2@30.95,70.425 R40.2@30.95,68.45 ; v1@28.775,87.2 v1(29.05,86.925) 29.325,86.65 R38.2@29.325,84.025 30.069,84.025 30.619,83.475 30.619,78.625 30.319,78.325 R37.2@29.375,78.325 30.275,77.425 30.275,76.321 v1(30.266,76.312) ; v1(29.566,16.884) v1@29.566,17.041 ; SW4.4@29.75,2.155 28.695,1.1 18.975,1.1 ; v1(33.7,67.975) 34.9,69.175 37.725,69.175 37.775,69.125 C103.2@37.775,67.6 ; C104.2@34.675,38.9 34.675,36.825 v1(34.7,36.8) ; P102.15@35.095,26.375 34,27.47 R108.1@34,29 34.028,29.028 34.028,30.95 34.732,31.654 35.714,31.654 38.262,29.105 R106.1@38.262,29 ; U6.19@35.125,44.245 36.895,44.245 v1(36.9,44.25) ; JP1.2@36.625,93.65 P2.2@42.875,93.65 44.082,93.65 44.482,93.25 44.482,87.293 D1.1@44.75,87.025 ; U2.6@37,17.15 40.375,20.525 41.45,21.6 41.45,24.5 42.1,25.15 43.4,25.15 44,25.75 44,28.525 R105.1@44.475,29 C105.2@48.375,29 ; v1(40.225,65.45) 40.265,65.41 40.99,65.41 ; R109.1@40.775,68.45 40.775,65.625 40.99,65.41 ; IC4.7@42.35,39.635 42.55,39.835 v1(42.55,41.25) 42.55,41.725 43.025,42.2 44.225,42.2 ; IC6.7@42.35,65.41 40.99,65.41 ; v1(42.55,55.95) 42.55,54.725 42.87,54.405 U6.10@44.225,54.405 44.405,54.225 R36.2@46.85,54.225 ; 43.05,17.11 v1(43.05,14.825) 43.05,12.85 D3.1@44.75,11.15 44.75,9.85 45.65,8.95 54.25,8.95 54.73,8.47 P104.10@54.73,6.095 57.15,3.675 v1(57.15,3.5) ; U6.1@44.225,42.975 44.225,42.2 ; v1(44.375,60.3) 44.405,60.33 IC5.12@46.425,60.33 IC5.13@46.425,59.06 ; R103.1@47.275,68.525 47.275,69.875 46.55,70.6 46.55,73.265 P101.12@47.825,74.54 ; U1.3@47.814,81.085 42.575,81.085 ; U1.5@47.814,84.5 47.275,84.5 D1.1@44.75,87.025 ; v1(49.45,65.65) 49.69,65.41 IC5.7@51.525,65.41 ; v1(49.675,39.575) 49.71,39.61 IC3.7@51.525,39.61 ; P101.13@50.365,72 P101.14@50.365,74.54 P101.12@47.825,74.54 ; v1(51,52.525) 51.035,52.56 IC2.7@52.9,52.56 ; P101.15@52.905,72 P101.16@52.905,74.54 ; R505.1@58.175,76.55 58.175,77.25 56.3,79.125 55.175,79.125 54.725,78.675 54.725,75.025 55.02,74.73 IC1.4@55.02,72.45 55.02,70.955 v1(55.325,70.65) 55.668,70.65 56.393,69.925 59.625,69.925 Q1.2@63.3,73.6 66.025,76.325 70.475,76.325 C3.2@73.35,79.2 ; U8.7@60.525,39.585 60.9,39.96 R101.1@60.9,42.775 59.5,42.775 v1(59.454,42.821) 52.446,42.821 51.825,42.2 44.225,42.2 ; U11.7@60.525,65.41 62.39,65.41 v1(62.4,65.4) ; D2.2@61,3.3 61.875,3.3 62.625,4.05 v1(62.625,5.075) ; v1(61.125,55.975) 61.925,55.175 R104.1@62.825,55.175 ; v1(62.65,33.875) 62.75,33.775 Q5.2@64.65,33.775 64.7,33.725 R102.1@64.7,31.65 64.7,29.775 64.488,29.562 63.825,30.225 60.015,30.225 59.602,29.812 54.787,29.812 54.3,29.325 54.3,23.675 56.825,21.15 59.8,21.15 60.325,21.675 60.325,23.65 61,24.325 U101.1@62.15,24.325 63.225,24.325 63.675,23.875 C102.2@64.35,23.875 65.775,23.875 66.075,23.575 R502.1@66.075,21.95 ; v1(64.925,55.175) R104.1@62.825,55.175 ; R107.1@65.025,52.375 64.665,52.735 U4.7@62.525,52.735 62.825,53.035 R104.1@62.825,55.175 ; v1(70.425,19.8) 70.45,19.775 C5.2@73.35,19.775 ; P103.12@74.195,47.68 75.955,47.68 76.725,48.45 R11.1@76.725,54.725 75.8,54.725 75.1,54.025 72.93,54.025 P103.5@71.655,55.3 P103.3@71.655,57.84 ; P103.4@74.195,57.84 P103.3@71.655,57.84 ; P103.2@74.195,60.38 P103.1@71.655,60.38 P103.3@71.655,57.84 ; C4.2@17.675,6.425 17.675,2.05 18.625,1.1 18.975,1.1 ; 42.575,81.085 42.575,76.525 42.975,76.125 47.65,76.125 47.825,75.95 P101.12@47.825,74.54 ; 42.575,81.085 37.265,81.085 U1.6@37.225,81.125 38.85,81.125 D1.1@44.75,87.025
  Top Layer w0.8: U2.6@37,21.93 U2.6@37,17.15 37.04,17.11 43.05,17.11 U2.3@47.589,17.11 ; U2.6@40.375,20.525 U2.5@47.589,20.525
  Bottom Layer w0.3: P4.2@24.125,5.4 24.83,4.695 SW4.3@29.75,4.695 ; P5.2@24.125,93.65 27.625,93.65 29.05,92.225 v1(29.05,86.925) 37.6,86.925 38.75,88.075 38.75,92.525 37.625,93.65 JP1.2@36.625,93.65 ; v1(29.45,26.925) 29.45,25.4 30.575,24.275 v1(30.575,17) 29.5,17 29.566,16.934 v1(29.566,16.884) ; v1@29.45,51.905 v1@29.725,52.18 ; SW4.4@29.75,2.155 SW4.3@29.75,4.695 ; v1(29.8,51.905) 29.8,44.2 ; v1@30.075,52.18 v1(30.075,63.71) 30.075,67.625 ; v1(30.266,76.312) 30.266,75.141 v1(29.15,74.025) 29.15,68.55 30.075,67.625 ; v1(34.7,36.8) 29.45,36.8 29.425,36.825 ; P102.15@35.095,26.375 P102.16@35.095,23.835 ; P101.2@35.125,74.54 P101.1@35.125,72 ; v1(36.9,44.25) 29.85,44.25 29.8,44.2 ; P102.14@37.635,23.835 P102.16@35.095,23.835 ; P101.4@37.665,74.54 P101.3@37.665,72 ; v1(40.225,65.45) 40.225,66.975 37.665,69.535 P101.3@37.665,72 ; v1(42.55,41.25) v1(42.55,55.95) 46.3,55.95 47.925,54.325 47.925,47.525 48.325,47.125 61.95,47.125 62.221,47.396 62.221,50.704 ; v1(43.05,14.825) 34.8,14.825 SW4.1@29.75,9.775 SW4.2@29.75,7.235 SW4.3@29.75,4.695 ; v1(44.375,60.3) 42.7,60.3 42.2,60.8 42.2,67.55 43.625,68.975 50.65,68.975 ; v1(49.675,39.575) 49.675,41.825 50.671,42.821 v1(59.454,42.821) 63.75,42.821 64.521,42.05 64.521,34.125 64.271,33.875 v1(62.65,33.875) 58.25,33.875 56.906,35.219 56.216,35.219 55.919,35.516 55.919,35.541 55.516,35.944 53.659,35.944 v1(50.4,32.685) ; P101.13@50.365,72 P101.15@52.905,72 54.975,72 55.125,71.85 55.125,69.75 54.271,68.896 52.811,68.896 52.732,68.975 50.65,68.975 ; P101.14@50.365,74.54 P101.16@52.905,74.54 ; v1(51,52.525) 60.4,52.525 62.221,50.704 ; v1(61.125,55.975) 62.221,54.879 62.221,50.704 ; v1(62.4,65.4) 60.8,65.4 60.3,64.9 58.625,64.9 57.875,65.65 v1(49.45,65.65) 50.65,66.85 50.65,68.975 ; v1(62.625,5.075) 61.05,3.5 v1(57.15,3.5) 57.15,5.26 59.381,7.491 59.381,9.816 69.365,19.8 v1(70.425,19.8) 70.425,20.86 74.156,24.591 74.156,34.331 75.875,36.05 75.875,46.875 75.07,47.68 P103.12@74.195,47.68 ; v1(64.925,55.175) 71.53,55.175 P103.5@71.655,55.3 ; 29.425,36.825 29.425,39.625 v1(29.9,40.1) 29.8,40.2 29.8,44.2 ; 29.425,36.825 v1(29.425,28) 33.59,23.835 P102.16@35.095,23.835 ; 30.075,67.625 30.425,67.975 v1(33.7,67.975) 35.125,69.4 P101.1@35.125,72 ; P101.1@35.125,72 P101.3@37.665,72
  other v1: 40.5,5.25 13.525,7.025 18.875,9.225 36.525,17.525 38.1,17.525 39.575,17.525 36.525,19.125 38.1,19.125 39.575,19.125 43.1,20.575 38.1,20.725 39.575,20.725 61.225,21.5 29.9,38.95 53.225,42.325 29.8,50.75 56.8,54.05 65.9,61.475 30.1,62.5 60.812,71.029 62.231,71.029 63.65,71.029 65.069,71.029 60.812,72.239 62.231,72.239 63.65,72.239 65.069,72.239 60.812,73.45 62.231,73.45 63.65,73.45 65.069,73.45 60.812,74.661 62.231,74.661 63.65,74.661 65.069,74.661 60.812,75.871 62.231,75.871 63.65,75.871 65.069,75.871 29.075,85.975
IN1A: U5.2 U6.16 | length 26.7
  Top Layer w0.254: U5.2@25.658,29.565 31.015,29.565 32.558,31.108 32.558,34.123 32.967,34.532 32.967,47.842 33.18,48.055 U6.16@35.125,48.055
IN1A_: IC2.6 U6.4 | length 18.6
  Top Layer w0.254: U6.4@43.85,46.785 45.115,46.785 45.95,45.95 45.95,44.275 46.792,43.433 50.558,43.433 50.917,43.792 50.917,50.517 51.69,51.29 IC2.6@52.9,51.29
IN1B: U6.18 U7.2 | length 35.2
  Top Layer w0.254: U7.2@25.658,17.76 30.085,17.76 31.2,18.875 31.2,28.975 33.04,30.815 33.04,33.923 33.45,34.332 33.45,45.38 33.585,45.515 U6.18@35.125,45.515